# Altium PCB 1-LightingAndSolenoidValve.PcbDoc (part 2 of 3)
Units mm, origin at the board's own origin, x right, y up, seen from the top; angles counter-clockwise.
Board outline 272 x 85 mm, 2 copper layers (Top Layer, Bottom Layer); 366 components, 221 nets, 1073 pads, 653 vias.
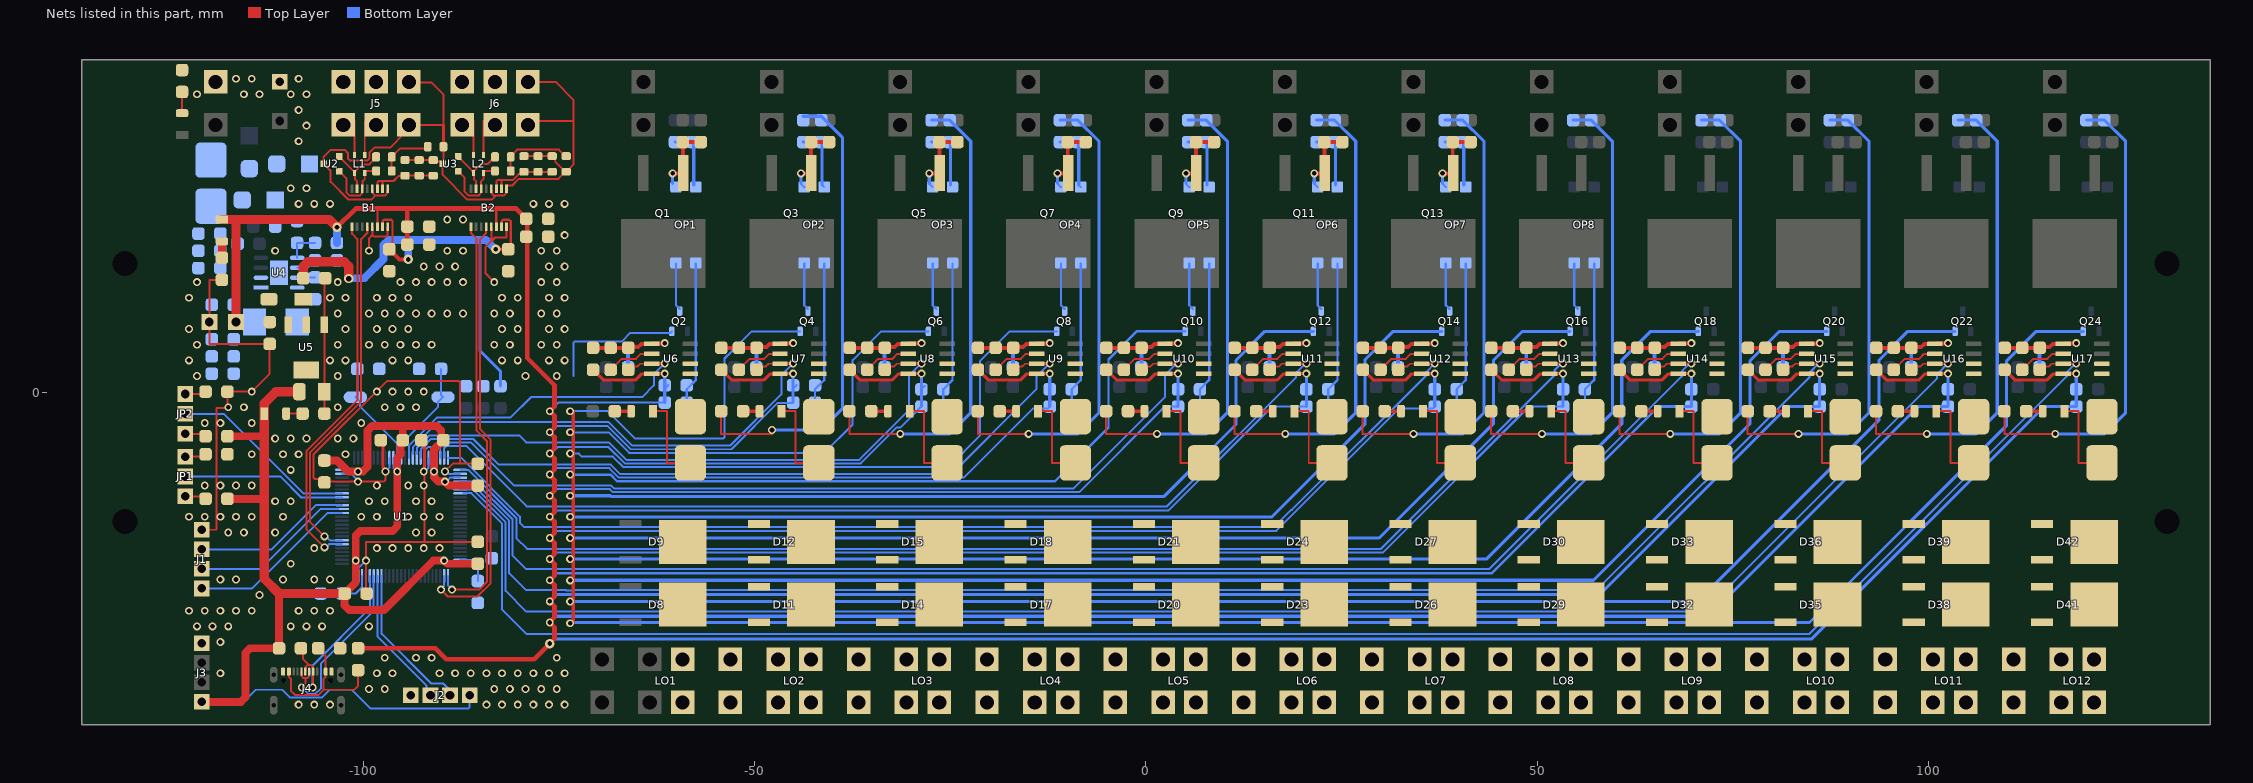
[diagram p2: the nets of this part, all layers, seen from the top]

## Via types
v1: diameter 1, hole 0.6, Top Layer to Bottom Layer, tented both sides, 648 vias
v2: diameter 1.2, hole 0.6, Top Layer to Bottom Layer, tented both sides, 4 vias
v3: diameter 1.2, hole 0.7, Top Layer to Bottom Layer, tented both sides, 1 vias

## Nets (pads, with @x,y where several pads share a name; then routed paths per layer and width w, separated by ;. In a path a pad name is that pad's centre, name@x,y a point inside that pad or via, vN(x,y) a via of type N, cw(c..) or ccw(c..) an arc to the next point about the centre after c; other vN are vias at no path point) (continued)
2GND: D11.1 D11.3 D12.1 D12.3 LO2.2 LO2.4 N2.1 N2.2 R32.2 R33.2 R36.2 | length 60.3
  Top Layer w0.254: R36.2@-54.3,-2.4 -54.3,-5.3 v1@-47.8,-5.3
  Bottom Layer w0.4: v1(-47.8,-4.8) -41.5,-4.8 -38.8,-2.1 -38.8,32.6 -41.5,35.3 R33.2@-43.8,35.3
3GND: D14.1 D14.3 D15.1 D15.3 LO3.2 LO3.4 N3.1 N3.2 R41.2 R42.2 R45.2 | length 60.3
  Top Layer w0.254: R45.2@-37.9,-2.4 -37.9,-5.3 v1(-31.4,-5.3)
  Bottom Layer w0.4: v1(-31.4,-5.3) -25.1,-5.3 -22.4,-2.6 -22.4,32.1 R41.2@-25.1,34.8 R42.2@-27.4,34.8
3v3MCU: B1.7 B2.7 C8.2 C9.2 C10.2 C11.2 C12.2 C13.2 C17.1 C24.1 C40.1 C41.1 D6.1 D7.1 J2.1 J3.1 R2.2 R4.2 R5.1 R6.2 U1.11 U1.19 U1.21 U1.22 U1.28 U1.50 U1.75 U1.100 U5.2 U5.4 | length 278.6
  Top Layer w0.3: B1.7@-97.575,21.175 -97.55,21.2 -97.55,21.899 -97.374,22.075 -96.476,22.075 -96.3,21.899 -96.3,18.7 C17.1@-96.7,18.3 ; B2.7@-82.35,21.2 -82.35,21.899 -82.174,22.075 -81.405,22.075 -81.2,21.87 -81.2,18.6 C24.1@-81.5,18.3
  Top Layer w0.4: v2(-83.1,18.3) C24.1@-81.5,18.3
  Top Layer w0.5: C17.1@-96.7,18.3 -95.4,17 v2(-94.3,17)
  Top Layer w1: J3.1@-120.7,-39.55 -115.686,-39.55 -115.1,-38.964 -115.1,-33.286 -114.514,-32.7 R5.1@-110.8,-32.7 -110.8,-25.7 ; R2.2@-117.4,-13.6 -112.7,-13.6 ; R6.2@-117.4,-5.6 -112.849,-5.6 -112.7,-5.451 ; C9.2@-105,-8.7 -103.4,-8.7 -102,-10.1 v1(-100.7,-10.1) -100.086,-10.1 -99.5,-9.514 -99.5,-4.886 -98.914,-4.3 -95,-4.3 ; C8.2@-85.4,-21.9 -89.3,-21.9 v1(-89.7,-21.5) -91.1,-21.5 -97.4,-27.8 -101.841,-27.8 -102.427,-27.214 -102.427,-25.727 C12.2@-102.4,-25.7 -101,-24.3 v1(-101,-21.5) -101,-18.286 -100.414,-17.7 -96.286,-17.7 -95.7,-17.114 v1(-95.7,-10.1) -95.7,-8.352 -95.273,-7.925 -95.273,-6.373 C13.2@-95,-6.1 -95,-4.3 ; C11.2@-85.4,-11.9 -89.1,-11.9 v1(-89.6,-11.4) -90.414,-11.4 -91,-10.814 v1(-91,-10.1) -91,-7.3 C10.2@-89.8,-6.1 -90.073,-5.827 -90.073,-4.886 -90.659,-4.3 -95,-4.3
  Top Layer w1.2: C40.1@-108.2,0.1 -111.2,0.1 -112.7,-1.4 D6.1@-112.7,-2.7 -112.7,-5.451 -112.7,-13.6 -112.7,-23.8 -110.8,-25.7 C12.2@-102.4,-25.7 ; C41.1@-107.7,14.6 -107.7,16.114 -107.114,16.7 -102.486,16.7 -101.9,16.114 v3(-101.9,14.558)
  Bottom Layer w0.254: J3.1@-120.7,-39.55 -120.65,-39.6 -115.4,-39.6 -113.8,-38 -110.4,-38 -109.419,-38.981 -105.281,-38.981 -104.3,-38 -101.5,-38 -99.1,-40.4 -86.6,-40.4 -86.45,-40.25 J2.1@-86.45,-38.7 ; U1.100@-102.75,-9.9 -101.102,-9.9 -100.902,-10.1 v1(-100.7,-10.1) ; U1.75@-101.2,-23.45 -101.2,-21.902 -101,-21.702 v1(-101,-21.5) ; U1.11@-96.2,-8.35 -96.2,-9.6 v1(-95.7,-10.1) ; U1.19@-92.2,-8.35 -92.191,-8.341 -92.191,-7.417 -91.78,-7.005 -91.395,-7.005 -91.209,-7.191 -91.209,-8.341 U1.21@-91.2,-8.35 ; v1@-91.2,-9.698 v1@-91,-9.898 ; v1(-89.7,-21.5) -89.498,-21.5 -89.098,-21.9 U1.50@-87.65,-21.9 ; v1(-89.6,-11.4) -89.431,-11.4 -88.931,-10.9 U1.28@-87.65,-10.9
  Bottom Layer w0.28: v1@-91.2,-9.698 U1.21@-91.2,-8.35 ; v1@-91,-9.907 -90.7,-9.607 U1.22@-90.7,-8.35
  Bottom Layer w0.4: -85.1,19.5 -85.1,5.3 -82.5,2.7 R4.2@-82.5,0.8
  Bottom Layer w1: v3@-101.8,14.6 -99.9,14.6 -97.45,17.05 -97.45,18.85 -96.8,19.5 -85.1,19.5 -84.354,19.5 -83.154,18.3 v2(-83.1,18.3) ; v2(-94.3,17) -94.3,19.5
4GND: D17.1 D17.3 D18.1 D18.3 LO4.2 LO4.4 N4.1 N4.2 R50.2 R51.2 R54.2 | length 60.3
  Top Layer w0.254: R54.2@-21.5,-2.4 -21.5,-5.3 v1(-15,-5.3)
  Bottom Layer w0.4: v1(-15,-5.3) -8.7,-5.3 -6,-2.6 -6,32.1 R50.2@-8.7,34.8 R51.2@-11,34.8
5GND: D20.1 D20.3 D21.1 D21.3 LO5.2 LO5.4 N5.1 N5.2 R59.2 R60.2 R63.2 | length 60.3
  Top Layer w0.254: R63.2@-5.1,-2.4 -5.1,-5.3 v1(1.4,-5.3)
  Bottom Layer w0.4: v1(1.4,-5.3) 7.7,-5.3 10.4,-2.6 10.4,32.1 R59.2@7.7,34.8 R60.2@5.4,34.8
5V: B1.6 B2.6 C15.2 C16.2 C22.2 C23.2 C34.1 C35.1 C36.1 C37.1 C38.1 C39.1 C43.1 C46.1 C49.1 C52.1 C55.1 C58.1 C61.1 C64.1 C67.1 C70.1 C73.1 C76.1 D3.1 D7.2 FUSE_SMD1.1 L3.2 R15.2 R21.2 R22.2 R30.2 R31.2 R39.2 R40.2 R48.2 R49.2 R57.2 R58.2 R66.2 R67.2 R75.2 R76.2 R84.2 R85.2 R93.2 R94.2 R102.2 R103.2 R111.2 R112.2 R120.2 R121.2 U5.3 U6.8 U7.8 U8.8 U9.8 U10.8 U11.8 U12.8 U13.8 U14.8 U15.8 U16.8 U17.8 | length 1665.5
  Top Layer w0.3: B1.6@-98.225,21.175 -98.225,23.475 -98.2,23.5 ; B2.6@-83.025,21.175 -83.025,23.475 -83,23.5
  Top Layer w0.4: C43.1@-70.673,2.9 -69.373,1.6 -65.2,1.6 -64.434,2.366 U6.8@-63.202,2.366 ; U6.8@-63.171,2.398 v1@-61.503,2.398 ; C46.1@-54.273,2.9 -52.973,1.6 -48.8,1.6 -48.034,2.366 U7.8@-46.802,2.366 ; U7.8@-46.771,2.398 v1@-45.103,2.398 ; C49.1@-37.873,2.9 -36.573,1.6 -32.4,1.6 -31.634,2.366 U8.8@-30.402,2.366 ; U8.8@-30.371,2.398 v1@-28.703,2.398 ; C52.1@-21.473,2.9 -20.173,1.6 -16,1.6 -15.234,2.366 U9.8@-14.002,2.366 ; U9.8@-13.971,2.398 v1@-12.303,2.398 ; C55.1@-5.073,2.9 -3.773,1.6 0.4,1.6 1.166,2.366 U10.8@2.398,2.366 ; U10.8@2.429,2.398 v1@4.097,2.398 ; C58.1@11.327,2.9 12.627,1.6 16.8,1.6 17.566,2.366 U11.8@18.798,2.366 ; U11.8@18.829,2.398 v1@20.497,2.398 ; C61.1@27.727,2.9 29.027,1.6 33.2,1.6 33.966,2.366 U12.8@35.198,2.366 ; U12.8@35.229,2.398 v1@36.897,2.398 ; C64.1@44.127,2.9 45.427,1.6 49.6,1.6 50.366,2.366 U13.8@51.598,2.366 ; U13.8@51.629,2.398 v1@53.297,2.398 ; C67.1@60.527,2.9 61.827,1.6 66,1.6 66.766,2.366 U14.8@67.998,2.366 ; U14.8@68.029,2.398 v1@69.697,2.398 ; C70.1@76.927,2.9 78.227,1.6 82.4,1.6 83.166,2.366 U15.8@84.398,2.366 ; U15.8@84.429,2.398 v1@86.097,2.398 ; C73.1@93.327,2.9 94.627,1.6 98.8,1.6 99.566,2.366 U16.8@100.798,2.366 ; U16.8@100.829,2.398 v1@102.497,2.398 ; C76.1@109.727,2.9 111.027,1.6 115.2,1.6 115.966,2.366 117.198,2.366 U17.8@117.227,2.395 117.229,2.398 118.898,2.398 v1(118.9,2.4)
  Top Layer w0.6: v2(-103.4,21.1) -101,23.5 -98.2,23.5 -94.6,23.5 ; FUSE_SMD1.1@-100.7,-32.7 -90.813,-32.7 -89.413,-34.1 -78.2,-34.1 v2(-76.2,-32.1) -76.2,-32.049 -75.6,-31.449 -75.6,-30 v1(-76.2,-29.4) -76.2,-29.349 -75.6,-28.749 -75.6,-27.351 -76.2,-26.751 v1(-76.2,-26.7) -75.6,-26.1 -75.6,-24.6 v1(-76.2,-24) -75.6,-23.4 -75.6,-21.9 v1(-76.2,-21.3) -75.6,-20.7 -75.6,-19.2 v1(-76.2,-18.6) -75.6,-18 -75.6,-16.5 v1(-76.2,-15.9) -75.6,-15.3 -75.6,-13.8 v1(-76.2,-13.2) ; C16.2@-94.4,18.9 C15.2@-94.4,21.2 -94.4,23.3 -94.6,23.5 ; v1@-76.2,-13.149 -75.6,-12.549 -75.6,-11.151 -76.2,-10.551 v1(-76.2,-10.5) -75.6,-9.9 -75.6,-8.4 v1(-76.2,-7.8) -75.6,-7.2 -75.6,-5.7 v1(-76.2,-5.1) -75.6,-4.5 -75.6,-3 v1(-76.2,-2.4) -75.6,-1.8 -75.6,0.9 -79.1,4.4 -79.1,22.1 C22.2@-79.2,22.2 -80.5,23.5 -83,23.5 -94.6,23.5
  Top Layer w1.2: D3.1@-118.1,22.1 -116.3,22.1 ; C38.1@-116.3,9 -116.3,22.1 ; v2(-103.4,21.1) -104.4,22.1 -116.3,22.1
  Bottom Layer w0.254: v1(-76.2,-21.3) -75.373,-20.473 30.28,-20.473 48.953,-1.8 R85.2@53.3,-1.8 ; v1(-76.2,-18.6) -75.284,-17.684 16.67,-17.684 32.28,-2.073 36.627,-2.073 R76.2@36.9,-1.8 ; v1(-76.2,-15.9) -75.373,-15.073 2.88,-15.073 16.153,-1.8 R67.2@20.5,-1.8 ; v1(-76.2,-13.2) -75.373,-12.373 -68.523,-12.373 -68.14,-12.756 -8.556,-12.756 2.4,-1.8 R58.2@4.1,-1.8 ; v1(-76.2,-10.5) -75.373,-9.673 -68.59,-9.673 -67.369,-10.894 -23.294,-10.894 -14.473,-2.073 -12.573,-2.073 R49.2@-12.3,-1.8 ; v1(-76.2,-7.8) -76.043,-7.8 -75.216,-6.973 -68.721,-6.973 -66.616,-9.078 -52.226,-9.078 -40.554,-9.078 -36.436,-9.078 -31.831,-4.473 -31.373,-4.473 R40.2@-28.7,-1.8 ; v1(-76.2,-5.1) -75.373,-4.273 -68.853,-4.273 -65.864,-7.262 -53.455,-7.262 -52.978,-7.262 -47.048,-1.332 -45.132,-1.332 R31.2@-45.1,-1.3 ; v1(-76.2,-2.4) -75.1,-1.3 R21.2@-61.5,-1.3 ; R22.2@-61.5,0.5 R22.2@-61.065,0.935 ; R30.2@-45.1,0.5 R30.2@-44.665,0.935 ; R39.2@-28.7,0.4 R39.2@-28.265,0.835
  Bottom Layer w0.35: v1(-76.2,-24) -75.3,-23.1 44.2,-23.1 65.5,-1.8 R94.2@69.7,-1.8
  Bottom Layer w0.4: v2(-76.2,-32.1) -75.6,-31.5 85.1,-31.5 114.8,-1.8 R121.2@118.9,-1.8 R120.2@118.9,0.4 v1(118.9,2.4) ; v1(-76.2,-29.4) -75.4,-28.6 71.9,-28.6 98.7,-1.8 R112.2@102.5,-1.8 v1(102.5,2.4) ; v1(-76.2,-26.7) -75.319,-25.819 -74.359,-25.819 -74.349,-25.829 -72.851,-25.829 -72.841,-25.819 57.981,-25.819 82,-1.8 R103.2@86.1,-1.8 v1(86.1,2.4) ; R21.2@-61.5,-1.3 -61.5,0.5 v1(-61.5,2.4) ; R31.2@-45.1,-1.3 -45.1,0.5 v1(-45.1,2.4) ; R40.2@-28.7,-1.8 R39.2@-28.7,0.4 v1(-28.7,2.4) ; R49.2@-12.3,-1.8 v1(-12.3,2.4) ; R58.2@4.1,-1.8 v1(4.1,2.4) ; R67.2@20.5,-1.8 v1(20.5,2.4) ; R76.2@36.9,-1.8 v1(36.9,2.4) ; R85.2@53.3,-1.8 v1(53.3,2.4) ; R94.2@69.7,-1.8 v1(69.7,2.4)
  Bottom Layer w1: R15.2@-103.4,19.1 v2(-103.4,21.1)
6GND: D23.1 D23.3 D24.1 D24.3 LO6.2 LO6.4 N6.1 N6.2 R68.2 R69.2 R72.2 | length 60.3
  Top Layer w0.254: R72.2@11.3,-2.4 11.3,-5.3 v1(17.8,-5.3)
  Bottom Layer w0.4: v1(17.8,-5.3) 24.1,-5.3 26.8,-2.6 26.8,32.1 R68.2@24.1,34.8 R69.2@21.8,34.8
7GND: D26.1 D26.3 D27.1 D27.3 LO7.2 LO7.4 N7.1 N7.2 R77.2 R78.2 R81.2 | length 60.3
  Top Layer w0.254: R81.2@27.7,-2.4 27.7,-5.3 v1(34.2,-5.3)
  Bottom Layer w0.4: v1(34.2,-5.3) 40.5,-5.3 43.2,-2.6 43.2,32.1 R77.2@40.5,34.8 R78.2@38.2,34.8
8GND: D29.1 D29.3 D30.1 D30.3 LO8.2 LO8.4 N8.1 N8.2 R86.2 R87.2 R90.2 | length 60.3
  Top Layer w0.254: R90.2@44.1,-2.4 44.1,-5.3 v1(50.6,-5.3)
  Bottom Layer w0.4: v1(50.6,-5.3) 56.9,-5.3 59.6,-2.6 59.6,32.1 R86.2@56.9,34.8 R87.2@54.6,34.8
9GND: D32.1 D32.3 D33.1 D33.3 LO9.2 LO9.4 N9.1 N9.2 R95.2 R96.2 R99.2 | length 60.3
  Top Layer w0.254: R99.2@60.5,-2.4 60.5,-5.3 v1(67,-5.3)
  Bottom Layer w0.4: v1(67,-5.3) 73.3,-5.3 76,-2.6 76,32.1 R95.2@73.3,34.8 R96.2@71,34.8
10GND: D35.1 D35.3 D36.1 D36.3 LO10.2 LO10.4 N10.1 N10.2 R104.2 R105.2 R108.2 | length 60.3
  Top Layer w0.254: R108.2@76.9,-2.4 76.9,-5.3 v1(83.4,-5.3)
  Bottom Layer w0.4: v1(83.4,-5.3) 89.7,-5.3 92.4,-2.6 92.4,32.1 R104.2@89.7,34.8 R105.2@87.4,34.8
11GND: D38.1 D38.3 D39.1 D39.3 LO11.2 LO11.4 N11.1 N11.2 R113.2 R114.2 R117.2 | length 60.3
  Top Layer w0.254: R117.2@93.3,-2.4 93.3,-5.3 v1(99.8,-5.3)
  Bottom Layer w0.4: v1(99.8,-5.3) 106.1,-5.3 108.8,-2.6 108.8,32.1 R113.2@106.1,34.8 R114.2@103.8,34.8
12GND: D41.1 D41.3 D42.1 D42.3 LO12.2 LO12.4 N12.1 N12.2 R122.2 R123.2 R126.2 | length 60.3
  Top Layer w0.254: R126.2@109.7,-2.4 109.7,-5.3 v1(116.2,-5.3)
  Bottom Layer w0.4: v1(116.2,-5.3) 122.5,-5.3 125.2,-2.6 125.2,32.1 R122.2@122.5,34.8 R123.2@120.2,34.8
Boot0: JP2.2 U1.94 | length 24.3
  Bottom Layer w0.254: JP2.2@-122.8,-2.74 -117.86,-2.74 -107.7,-12.9 U1.94@-102.75,-12.9
DCin: C31.1 C32.1 C33.1 D5.2 FH1.2 R16.1 U4.2
feedback: R15.1 R17.2 U4.5 | length 4.2
  Bottom Layer w0.254: U4.5@-108.484,17.205 -108.5,17.221 R17.2@-108.5,19.1 R15.1@-106.2,19.1
MCUGND: B1.5 B1.8 B2.5 B2.8 C1.1 C2.1 C3.1 C4.1 C5.1 C6.1 C7.1 C8.1 C9.1 C10.1 C11.1 C12.1 C13.1 C15.1 C16.1 C17.2 C22.1 C23.1 C24.2 C28.2 C29.2 C31.2 C32.2 C33.2 C34.2 C35.2 C36.2 C37.2 C38.2 C39.2 C40.2 C41.2 C42.2 C43.2 C44.2 C45.2 C46.2 C47.2 C48.2 C49.2 C50.2 C51.2 C52.2 C53.2 C54.2 C55.2 C56.2 C57.2 C58.2 C59.2 C60.2 C61.2 C62.2 C63.2 C64.2 C65.2 C66.2 C67.2 C68.2 C69.2 C70.2 C71.2 C72.2 C73.2 C74.2 C75.2 C76.2 C77.2 D4.1 D5.1 J1.4 J2.4 J3.4 J4.A1B12 J4.B1A12 POWER1.1 Q2.2 Q4.2 Q6.2 Q8.2 Q10.2 Q12.2 Q14.2 Q16.2 Q18.2 Q20.2 Q22.2 Q24.2 R1.2 R3.2 R7.2 R12.1 R13.1 R14.1 R17.1 R18.2 R26.2 R35.2 R44.2 R53.2 R62.2 R71.2 R80.2 R89.2 R98.2 R107.2 R116.2 R125.2 U1.10 U1.20 U1.27 U1.74 U1.99 U4.1 U4.9 U5.1 U6.5 U7.5 U8.5 U9.5 U10.5 U11.5 U12.5 U13.5 U14.5 U15.5 U16.5 U17.5 | length 1755.1
  Top Layer w0.254: J1.4@-120.7,-17.55 -118.8,-17.55 -118.8,-2 -117.4,-2 R7.2@-117.4,0.1 -114.3,0.1 -112,2.4 C39.2@-112,6.2 -119.7,6.2 C38.2@-119.7,9 -119.7,14.4 R13.1@-118.1,14.4 ; R14.1@-105,-2.7 C40.2@-105,0.1 ; C40.2@-105,0.1 U5.1@-104.999,8.649 -104.999,14.6 C41.2@-104.9,14.6 ; v1@-100.75,-11.35 v1(-100.7,-11.4) ; C12.1@-99.6,-25.7 -99.7,-25.6 v1(-99.7,-21.5) -99.7,-19.1 -92.2,-19.1 ; v1(-99.3,18.1) -99.3,19.699 -98.875,20.124 ; B1.5@-98.875,21.175 -98.875,20.124 ; C13.1@-97.8,-6.1 C13.1@-97.527,-6.373 ; v1@-97.2,-9.905 -97.2,-11.151 -97.449,-11.4 v1(-100.7,-11.4) ; B1.8@-96.925,21.175 -96.925,20.049 -97.074,19.9 -98.651,19.9 -98.875,20.124 ; C10.1@-92.6,-6.1 C10.1@-92.2,-6.5 ; v1(-92.3,-10.1) -92.2,-10.2 -92.2,-19.1 ; v1(-89.6,-10.1) -88.6,-9.1 -87.7,-9.1 ; C8.1@-85.4,-19.1 -92.2,-19.1 ; C11.1@-85.4,-9.1 -87.7,-9.1 ; -83.8,19.6 -83.675,19.725 B2.5@-83.675,21.175 ; v1(-83.3,14.1) -84.4,15.2 -84.4,18.6 -83.2,19.8 -81.725,19.8 B2.8@-81.725,21.175 ; v1(-100.7,-11.4) -104.9,-11.4 C9.1@-105,-11.5 -105.418,-11.082 -106.251,-11.082 -106.4,-10.933 -106.4,-7.922 -97,1.478 -87.849,1.478 -87.7,1.33 -87.7,-9.1
  Top Layer w0.4: C13.1@-97.527,-6.373 -97.527,-9.578 v1@-97.2,-9.905 ; v1@-92.2,-10.1 C10.1@-92.2,-6.5 ; v1@-73.2,-29.4 v1@-73.2,-2.4
  Top Layer w0.5: C43.2@-70.673,5.7 C44.2@-66.173,5.7 ; C44.2@-66.089,5.784 -64.916,5.784 -64.495,6.205 U6.5@-63.173,6.205 ; U6.5@-63.126,6.252 v1@-61.548,6.252 ; C46.2@-54.273,5.7 C47.2@-49.773,5.7 ; C47.2@-49.689,5.784 -48.516,5.784 -48.095,6.205 U7.5@-46.773,6.205 ; U7.5@-46.726,6.252 v1@-45.148,6.252 ; C49.2@-37.873,5.7 C50.2@-33.373,5.7 ; C50.2@-33.289,5.784 -32.116,5.784 -31.695,6.205 U8.5@-30.373,6.205 ; U8.5@-30.326,6.252 v1@-28.748,6.252 ; C52.2@-21.473,5.7 C53.2@-16.973,5.7 ; C53.2@-16.889,5.784 -15.716,5.784 -15.295,6.205 U9.5@-13.973,6.205 ; U9.5@-13.926,6.252 v1@-12.348,6.252 ; C55.2@-5.073,5.7 C56.2@-0.573,5.7 ; C56.2@-0.489,5.784 0.684,5.784 1.105,6.205 U10.5@2.427,6.205 ; U10.5@2.474,6.252 v1@4.052,6.252 ; C58.2@11.327,5.7 C59.2@15.827,5.7 ; C59.2@15.911,5.784 17.084,5.784 17.505,6.205 U11.5@18.827,6.205 ; U11.5@18.874,6.252 v1@20.452,6.252 ; C61.2@27.727,5.7 C62.2@32.227,5.7 ; C62.2@32.311,5.784 33.484,5.784 33.905,6.205 U12.5@35.227,6.205 ; U12.5@35.274,6.252 v1@36.852,6.252 ; C64.2@44.127,5.7 C65.2@48.627,5.7 ; C65.2@48.711,5.784 49.884,5.784 50.305,6.205 U13.5@51.627,6.205 ; U13.5@51.674,6.252 v1@53.252,6.252 ; C67.2@60.527,5.7 C68.2@65.027,5.7 ; C68.2@65.111,5.784 66.284,5.784 66.705,6.205 U14.5@68.027,6.205 ; U14.5@68.074,6.252 v1@69.652,6.252 ; C70.2@76.927,5.7 C71.2@81.427,5.7 ; C71.2@81.511,5.784 82.684,5.784 83.105,6.205 U15.5@84.427,6.205 ; U15.5@84.474,6.252 v1@86.052,6.252 ; C73.2@93.327,5.7 C74.2@97.827,5.7 ; C74.2@97.911,5.784 99.084,5.784 99.505,6.205 U16.5@100.827,6.205 ; U16.5@100.874,6.252 v1@102.452,6.252 ; C76.2@109.727,5.7 C75.2@111.977,5.7 C77.2@114.227,5.7 114.311,5.784 115.484,5.784 115.905,6.205 U17.5@117.227,6.205 117.274,6.252 118.853,6.252 v1(118.9,6.3)
  Bottom Layer w0.254: U1.99@-102.75,-10.4 -101.6,-10.4 -100.7,-11.3 v1(-100.7,-11.4) ; U1.74@-100.7,-23.45 -100.691,-23.441 -100.691,-22.491 v1(-99.7,-21.5) ; v1(-97.2,-10.1) -96.7,-9.6 U1.10@-96.7,-8.35 ; v1(-92.3,-10.1) -92.2,-10.1 -91.7,-9.6 U1.20@-91.7,-8.35 ; v1(-89.6,-10.1) -89.398,-10.1 -89.098,-10.4 U1.27@-87.65,-10.4 ; v1@-73.2,-7.8 -73.181,-7.819 -72.481,-7.819 -72.1,-8.2 -68.136,-8.2 -66.804,-9.532 -25.232,-9.532 -21.2,-5.5 -21.2,4.034 -17.434,7.8 Q8.2@-11.4,7.8 ; v1@-73.2,-5.1 -68.668,-5.1 -66.052,-7.716 -41.118,-7.716 -37.5,-4.098 -37.5,4.134 -33.834,7.8 Q6.2@-27.8,7.8 ; v1@-73.2,-2.4 -68.8,-2.4 -65.3,-5.9 -54.019,-5.9 -53.87,-5.751 -53.87,4.335 -53.487,4.717 -53.483,4.717 -50.4,7.8 Q4.2@-44.2,7.8 ; -73.2,2.1 -73.2,6.351 -73.051,6.5 -67,6.5 -65.9,7.6 -60.8,7.6 Q2.2@-60.6,7.8
  Bottom Layer w0.3: v1@-73.2,-10.5 -68.437,-10.5 -67.566,-11.371 -11.671,-11.371 -4.8,-4.5 -4.8,4.2 -1.2,7.8 Q10.2@5,7.8
  Bottom Layer w0.4: v1@-73.2,-29.4 84.798,-29.4 110,-4.198 110,4.034 113.766,7.8 Q24.2@119.8,7.8 ; v1@-73.2,-26.7 70.5,-26.7 93.7,-3.5 93.7,4.139 94.161,4.6 94.166,4.6 97.366,7.8 Q22.2@103.4,7.8 ; v1@-73.2,-24 57.2,-24 77.2,-4 77.2,4.034 80.966,7.8 Q20.2@87,7.8 ; v1@-73.2,-21.3 43.5,-21.3 60.8,-4 60.8,4.1 64.5,7.8 Q18.2@70.6,7.8 ; v1@-73.2,-18.6 29.8,-18.6 44.4,-4 44.4,4.08 48.12,7.8 Q16.2@54.2,7.8 ; v1@-73.2,-15.9 16.1,-15.9 28,-4 28,4.2 31.6,7.8 Q14.2@37.8,7.8 ; v1@-73.2,-13.2 -68.441,-13.2 -68.358,-13.283 2.317,-13.283 11.5,-4.1 11.5,4.1 15.2,7.8 Q12.2@21.4,7.8
  Bottom Layer w0.5: R26.2@-66.2,3.2 -66.2,5.3 ; R35.2@-49.8,3.2 -49.8,5.3 ; R44.2@-33.4,3.2 -33.4,5.3 ; R53.2@-17,3.2 -17,5.3 ; R62.2@-0.6,3.2 -0.6,5.3 ; R71.2@15.8,3.2 15.8,5.3 ; R80.2@32.2,3.2 32.2,5.3 ; R89.2@48.6,3.2 48.6,5.3 ; R98.2@65,3.2 65,5.3 ; R107.2@81.4,3.2 81.4,5.3 ; R116.2@97.8,3.2 97.8,5.3 ; R125.2@114.2,3.2 114.2,5.3
  other v1: -108.3,-39.9 -106.3,-39.9 -104.3,-39.9 -84.3,-39.9 -82.3,-39.9 -80.3,-39.9 -78.3,-39.9 -76.3,-39.9 -74.3,-39.9 -99.3,-37.9 -97.3,-37.9 -83.3,-37.9 -81.3,-37.9 -79.3,-37.9 -77.3,-37.9 -75.3,-37.9 -118.3,-35.9 -98.3,-35.9 -96.3,-35.9 -90.3,-35.9 -88.3,-35.9 -86.3,-35.9 -84.3,-35.9 -82.3,-35.9 -80.3,-35.9 -78.3,-35.9 -76.3,-35.9 -74.3,-35.9 -97.3,-33.9 -93.3,-33.9 -91.3,-33.9 -75.3,-33.9 -118.3,-31.9 -121.3,-29.9 -119.3,-29.9 -117.3,-29.9 -109.3,-29.9 -107.3,-29.9 -105.3,-29.9 -99.3,-29.9 -73.6,-29.5 -122.3,-27.9 -120.3,-27.9 -118.3,-27.9 -116.3,-27.9 -114.3,-27.9 -108.3,-27.9 -106.3,-27.9 -104.3,-27.9 -73.6,-26.729 -113.3,-25.9 -73.6,-24.021 -118.3,-23.9 -116.3,-23.9 -110.3,-23.9 -106.3,-23.9 -104.3,-23.9 -109.3,-21.9 -73.6,-21.3 -106.3,-19.9 -98.3,-19.9 -96.3,-19.9 -94.3,-19.9 -92.3,-19.9 -90.3,-19.9 -73.6,-18.6 -117.3,-17.9 -115.3,-17.9 -111.3,-17.9 -93.3,-17.9 -91.3,-17.9 -122.3,-15.9 -120.3,-15.9 -118.3,-15.9 -116.3,-15.9 -114.3,-15.9 -110.3,-15.9 -100.3,-15.9 -98.3,-15.9 -94.3,-15.9 -92.3,-15.9 -90.3,-15.9 -73.6,-15.9 -111.3,-13.9 -109.3,-13.9 -99.3,-13.9 -97.3,-13.9 -93.3,-13.9 -91.3,-13.9 -73.6,-13.2 -120.3,-11.9 -118.3,-11.9 -116.3,-11.9 -114.3,-11.9 -98.3,-11.9 -94.3,-11.9 -92.3,-11.9 -73.6,-10.5 -109.3,-9.9 -114.3,-7.9 -110.3,-7.9 -108.3,-7.9 -102.3,-7.9 -73.6,-7.8 -111.3,-5.9 -109.3,-5.9 -107.3,-5.9 -103.3,-5.9 -101.3,-5.9 -73.6,-5.1 -120.3,-3.9 -118.3,-3.9 -114.3,-3.9 -100.3,-3.9 -73.6,-2.4 -117.3,-1.9 -115.3,-1.9 -103.3,-1.9 -97.3,-1.9 -95.3,-1.9 -93.3,-1.9 -114.3,0.1 -98.3,0.1 -96.3,0.1 -94.3,0.1 -92.3,0.1 -121.3,2.1 -103.3,2.1 -79.3,2.1 -75.3,2.1 -122.3,4.1 -104.3,4.1 -102.3,4.1 -96.3,4.1 -94.3,4.1 -82.3,4.1 -80.3,4.1 -76.3,4.1 -74.3,4.1 -121.3,6.1 -103.3,6.1 -99.3,6.1 -97.3,6.1 -95.3,6.1 -93.3,6.1 -91.3,6.1 -83.3,6.1 -81.3,6.1 -77.3,6.1 -75.3,6.1 -61.5,6.3 -45.1,6.3 -28.7,6.3 -12.3,6.3 4.1,6.3 20.5,6.3 36.9,6.3 53.3,6.3 69.7,6.3 86.1,6.3 102.5,6.3 -122.3,8.1 -102.3,8.1 -98.3,8.1 -96.3,8.1 -94.3,8.1 -82.3,8.1 -80.3,8.1 -76.3,8.1 -74.3,8.1 -103.3,10.1 -99.3,10.1 -97.3,10.1 -95.3,10.1 -93.3,10.1 -91.3,10.1 -89.3,10.1 -87.3,10.1 -83.3,10.1 -81.3,10.1 -77.3,10.1 -75.3,10.1 -122.3,12.1 -104.3,12.1 -102.3,12.1 -98.3,12.1 -96.3,12.1 -94.3,12.1 -82.3,12.1 -80.3,12.1 -76.3,12.1 -74.3,12.1 -121.3,14.1 -103.3,14.1 -95.3,14.1 -93.3,14.1 -91.3,14.1 -89.3,14.1 -87.3,14.1 -77.3,14.1 -75.3,14.1 -92.3,16.1 -90.3,16.1 -88.3,16.1 -76.3,16.1 -74.3,16.1 -111.3,18.1 -89.3,18.1 -87.3,18.1 -77.3,18.1 -75.3,18.1 -74.3,20.1 -89.3,22.1 -87.3,22.1 -108.3,24.1 -106.3,24.1 -104.3,24.1 -78.3,24.1 -76.3,24.1 -74.3,24.1 -109.3,26.1 -107.3,26.1 -108.3,32.1 -107.3,34.1 -108.3,36.1 -121.3,38.1 -115.3,38.1 -113.3,38.1 -109.3,38.1 -107.3,38.1 -116.3,40.1 -114.3,40.1 -108.3,40.1
MGND: B1.9 B1.12 B2.9 B2.12 C14.2 C18.1 C19.1 C20.1 C21.2 C25.1 C26.1 C27.1 J5.3 J5.6 J6.3 J6.6 U2.3 U3.3 | length 102.8
  Top Layer w0.254: B1.12@-98.875,26.025 -98.827,25.977 -98.827,25.44 -98.535,25.148 ; B1.9@-96.925,26.025 -96.973,25.977 -96.973,25.44 -97.265,25.148 -98.535,25.148 ; C20.1@-94.7,29.7 C18.1@-92.9,29.7 C19.1@-91.1,29.7 -90.893,29.493 -90.193,29.493 U3.3@-89.9,29.2 ; J5.3@-94.2,39.691 -94.109,39.6 -91.3,39.6 -89.8,38.1 -89.8,34.166 -93.675,34.166 -94.2,34.691 -94.725,34.166 -94.725,33.175 -96.6,31.3 -98.616,31.3 -99.227,30.689 -99.227,29.911 -99.515,29.623 -101.723,29.623 -102,29.9 -102,30.6 -102.4,31 -104.2,31 -105.1,30.1 U2.3@-105.1,29.2 -104.2,28.3 -104.2,26.921 -101.925,24.646 -99.037,24.646 -98.535,25.148 ; C14.2@-89.8,31.4 -89.8,29.3 U3.3@-89.9,29.2 ; B2.12@-83.675,26.025 -83.627,25.977 -83.627,25.44 -83.335,25.148 -83.1,25.148 ; C27.1@-79.5,30.2 C25.1@-77.7,30.2 C26.1@-75.9,30.2 ; J6.6@-79,34.691 -73.173,34.691 ; J6.3@-79,39.691 -75.464,39.691 -73.173,37.4 -73.173,34.691 ; C26.1@-75.867,30.2 -75.503,29.836 -75.503,29.503 -74.2,28.2 -75.1,27.3 -80.142,27.3 -80.994,26.448 -81.677,26.448 -81.773,26.352 -81.773,25.44 -82.065,25.148 -83.1,25.148 ; C21.2@-74.1,28.2 -74.067,28.2 -73.627,28.64 -73.627,28.673 -73.173,29.127 -73.173,34.691 ; U3.3@-89.9,29.2 -89.9,27.821 -86.725,24.646 -83.602,24.646 -83.1,25.148
  Top Layer w0.4: C14.2@-89.8,31.4 -89.8,34.166
MODE: JP1.2 U1.93 | length 21.2
  Bottom Layer w0.254: JP1.2@-122.8,-10.74 -110.66,-10.74 -108,-13.4 U1.93@-102.75,-13.4
NetB1_1: B1.1 U1.81 | length 47.3
  Top Layer w0.254: v1(-105,-19.8) -107.308,-17.492 -107.308,-7.508 -100.8,-1 -100.8,19.6 -101.475,20.275 B1.1@-101.475,21.175
  Bottom Layer w0.254: v1(-105,-19.8) -104.798,-19.8 -104.398,-19.4 U1.81@-102.75,-19.4
NetB1_4: B1.4 U1.82 | length 45.8
  Top Layer w0.254: v1(-105,-18.4) -106.854,-16.546 -106.854,-7.696 -100.3,-1.142 -100.3,19.6 -99.525,20.375 B1.4@-99.525,21.175
  Bottom Layer w0.254: v1(-105,-18.4) -104.798,-18.4 -104.298,-18.9 U1.82@-102.75,-18.9
NetB1_10: B1.10 B1.11 C18.2 C19.2 C20.2 | length 9.4
  Top Layer w0.254: B1.11@-98.225,26.025 -98.225,26.851 -98.051,27.025 -97.426,27.025 ; B1.10@-97.575,26.025 -97.575,26.876 -97.426,27.025 ; C19.2@-91.1,27.7 C18.2@-92.9,27.7 C20.2@-94.7,27.7 -94.732,27.668 -95.532,27.668 -96.175,27.025 -97.426,27.025
NetB1_14: B1.14 L1.2 R9.1 U2.1 | length 9.8
  Top Layer w0.254: U2.1@-103.1,28.26 -102.2,27.36 -102.2,25.563 -101.785,25.148 -100.515,25.148 -100.223,25.44 -100.223,25.977 B1.14@-100.175,26.025 -100.145,26.055 -100.145,26.956 -99.85,27.251 L1.2@-99.85,28.05 -99.85,28.227 -99.777,28.3 R9.1@-98.4,28.3
NetB1_15: B1.15 L1.1 R8.2 U2.2 | length 8.7
  Top Layer w0.254: U2.2@-103.1,30.14 -103.1,30.11 -101.313,28.323 -101.223,28.323 -101.15,28.25 L1.1@-101.15,28.05 -101.107,28.007 -101.107,27.269 -100.825,26.986 B1.15@-100.825,26.025 ; L1.1@-101.077,28.245 -101.077,28.323 -100.999,28.323 -100.177,29.144 -99.256,29.144 -98.4,30 R8.2@-98.4,30.1
NetB2_1: B2.1 U1.51 | length 53.1
  Top Layer w0.254: v1(-88.7,-25.2) -85.242,-25.2 -84.224,-24.182 -84.224,-6.218 -85.554,-4.888 -85.554,19.654 -86.275,20.375 B2.1@-86.275,21.175
  Bottom Layer w0.254: U1.51@-89.2,-23.45 -89.2,-24.707 -88.707,-25.2 v1(-88.7,-25.2)
NetB2_4: B2.4 U1.52 | length 55.8
  Top Layer w0.254: v1(-90.1,-25.2) -90.1,-25.206 -89.206,-26.1 -85.5,-26.1 -83.77,-24.37 -83.77,-6.03 -85.1,-4.7 -85.1,19.6 -84.325,20.375 B2.4@-84.325,21.175
  Bottom Layer w0.254: v1(-90.1,-25.2) -90.1,-25.107 -89.7,-24.707 U1.52@-89.7,-23.45
NetB2_10: B2.10 B2.11 C25.2 C26.2 C27.2 | length 9.7
  Top Layer w0.254: B2.11@-83.025,26.025 -83.025,26.975 -82.875,27.125 -82.375,27.125 ; B2.10@-82.375,26.025 -82.375,27.125 ; C26.2@-75.9,28.2 C27.2@-79.5,28.2 -79.797,27.903 -80.181,27.903 -80.959,27.125 -82.375,27.125
NetB2_14: B2.14 L2.2 R11.1 U3.1 | length 9.8
  Top Layer w0.254: U3.1@-87.9,28.26 -87.096,27.456 -87.096,25.659 -86.585,25.148 -85.315,25.148 -85.023,25.44 -85.023,25.977 B2.14@-84.975,26.025 -84.975,26.986 -84.692,27.269 -84.692,28.008 L2.2@-84.65,28.05 -84.65,28.227 -84.577,28.3 R11.1@-83.2,28.3
NetB2_15: B2.15 L2.1 R10.2 U3.2 | length 8.6
  Top Layer w0.254: U3.2@-87.9,30.14 -87.9,30.11 -86.113,28.323 -86.023,28.323 L2.1@-85.95,28.25 ; B2.15@-85.625,26.025 -85.625,26.986 -85.907,27.269 -85.907,28.007 L2.1@-85.95,28.05 L2.1@-85.95,28.25 ; R10.2@-83.2,30.1 -83.2,30.067 -83.564,29.703 -83.597,29.703 -84.1,29.2 -85,29.2 L2.1@-85.95,28.25
NetC1_2: C1.2 FUSE_SMD1.2 J4.A4B9 J4.B4A9 | length 19.3
  Top Layer w0.254: J4.A4B9@-109.54,-36.081 -109.54,-36.341 -109.3,-36.581 -109.3,-38.1 -108.7,-38.7 -105.8,-38.7 -105.1,-38 ; C1.2@-105.8,-32.7 -104.84,-33.66 J4.B4A9@-104.84,-35.68 -104.863,-35.703 -104.863,-36.364 -105.1,-36.601 -105.1,-38 ; FUSE_SMD1.2@-100.7,-35.5 -100.7,-37.5 -101.2,-38 -105.1,-38
NetC2_2: C2.2 U1.13 X1.1 | length 13.7
  Bottom Layer w0.254: U1.13@-95.2,-8.35 -95.2,-6.558 -90.473,-1.831 -90.473,-1.176 -89.897,-0.6 X1.1@-89.85,-0.6 -90.1,-0.35 C2.2@-90.1,3
NetC3_2: C3.2 U1.12 X1.2 | length 13.6
  Bottom Layer w0.254: X1.2@-101.05,-0.6 -100.8,-0.35 C3.2@-100.8,3 ; X1.2@-101.003,-0.6 -100.427,-1.176 -100.427,-1.831 -95.7,-6.558 U1.12@-95.7,-8.35
NetC6_2: C6.2 U1.73 | length 4.3
  Bottom Layer w0.254: C6.2@-102.7,-25.7 -101,-25.7 -100.209,-24.909 -100.209,-23.459 U1.73@-100.2,-23.45
NetC7_2: C7.2 U1.49 | length 4.5
  Bottom Layer w0.254: U1.49@-87.65,-21.4 -87.641,-21.409 -86.191,-21.409 -85.4,-22.2 C7.2@-85.4,-24.1
NetC14_1: C14.1 R8.1 R9.2 | length 7
  Top Layer w0.254: R9.2@-96.4,28.3 R8.1@-96.4,30.1 -96.4,30.133 -96.036,30.497 -96.003,30.497 -95.3,31.2 -92,31.2 C14.1@-91.8,31.4
NetC21_1: C21.1 R10.1 R11.2 | length 9.7
  Top Layer w0.254: R11.2@-81.2,28.3 R10.1@-81.2,30.1 -81.2,30.2 -80.373,31.027 -75.027,31.027 -74.2,30.2 C21.1@-74.1,30.2
NetC29_1: C29.1 U4.6 | length 2.7
  Bottom Layer w0.254: U4.6@-108.484,15.935 -107.165,15.935 C29.1@-106.2,16.9
NetC30_1: C30.1 U4.7 | length 2.3
  Bottom Layer w0.254: U4.7@-108.484,14.665 -106.235,14.665 C30.1@-106.2,14.7
NetC30_2: C30.2 L3.1 U4.8
NetC42_1: C42.1 U6.6 | length 6.1
  Top Layer w0.254: C42.1@-68.423,2.9 -67.023,4.3 -65.2,4.3 -64.565,4.935 U6.6@-63.173,4.935
NetC44_1: C44.1 U1.15 U6.7 | length 43.8
  Top Layer w0.254: C44.1@-65.755,3.319 -64.992,3.319 -64.646,3.665 U6.7@-63.173,3.665
  Top Layer w0.4: U6.7@-63.154,3.684 v1@-61.516,3.684
  Bottom Layer w0.254: U1.15@-94.2,-8.35 -94.2,-6.842 -90.558,-3.2 -81.2,-3.2 -78.6,-0.6 -64.4,-0.6 -62.9,0.9 -62.9,2.3 v1(-61.498,3.702)
NetC45_1: C45.1 U7.6 | length 6.1
  Top Layer w0.254: C45.1@-52.023,2.9 -50.623,4.3 -48.8,4.3 -48.165,4.935 U7.6@-46.773,4.935
NetC47_1: C47.1 U1.16 U7.7 | length 62.2
  Top Layer w0.254: C47.1@-49.355,3.319 -48.592,3.319 -48.246,3.665 U7.7@-46.773,3.665
  Top Layer w0.4: U7.7@-46.754,3.684 v1@-45.116,3.684
  Bottom Layer w0.254: U1.16@-93.677,-7.9 -93.677,-6.961 -90.516,-3.8 -68.684,-3.8 -65.676,-6.808 -53.643,-6.808 -53.166,-6.808 -46.6,-0.242 -46.6,2.2 v1(-45.098,3.702)
NetC48_1: C48.1 U8.6 | length 6.1
  Top Layer w0.254: C48.1@-35.623,2.9 -34.223,4.3 -32.4,4.3 -31.765,4.935 U8.6@-30.373,4.935
NetC50_1: C50.1 U1.17 U8.7 | length 79.3
  Top Layer w0.254: C50.1@-32.955,3.319 -32.192,3.319 -31.846,3.665 U8.7@-30.373,3.665
  Top Layer w0.4: U8.7@-30.354,3.684 v1@-28.716,3.684
  Bottom Layer w0.254: U1.17@-93.177,-7.9 -93.177,-7.103 -91.574,-5.5 -80.1,-5.5 -79.219,-6.381 -68.671,-6.381 -66.428,-8.624 -36.624,-8.624 -30.3,-2.3 -30.3,2.1 v1(-28.698,3.702)
NetC51_1: C51.1 U9.6 | length 6.1
  Top Layer w0.254: C51.1@-19.223,2.9 -17.823,4.3 -16,4.3 -15.365,4.935 U9.6@-13.973,4.935
NetC53_1: C53.1 U1.18 U9.7 | length 95
  Top Layer w0.254: C53.1@-16.555,3.319 -15.792,3.319 -15.446,3.665 U9.7@-13.973,3.665
  Top Layer w0.4: U9.7@-13.954,3.684 v1@-12.316,3.684
  Bottom Layer w0.254: U1.18@-92.7,-8.35 -92.691,-8.341 -92.691,-7.259 -91.386,-5.954 -85.988,-5.954 -82.723,-9.219 -68.402,-9.219 -67.181,-10.44 -35.872,-10.44 -24.856,-10.44 -14,0.416 -14,2 v1(-12.298,3.702)
NetC54_1: C54.1 U10.6 | length 6.1
  Top Layer w0.254: C54.1@-2.823,2.9 -1.423,4.3 0.4,4.3 1.035,4.935 U10.6@2.427,4.935
NetC56_1: C56.1 U1.23 U10.7 | length 111
  Top Layer w0.254: C56.1@-0.155,3.319 0.608,3.319 0.954,3.665 U10.7@2.427,3.665
  Top Layer w0.4: U10.7@2.446,3.684 v1@4.084,3.684
  Bottom Layer w0.254: U1.23@-90.2,-8.35 -90.2,-6.958 -89.65,-6.408 -86.25,-6.408 -80.786,-11.872 -68.382,-11.872 -67.952,-12.302 -9.302,-12.302 2.4,-0.6 2.4,2.195 3.907,3.702 v1(4.102,3.702)
NetC57_1: C57.1 U11.6 | length 6.1
  Top Layer w0.254: C57.1@13.577,2.9 14.977,4.3 16.8,4.3 17.435,4.935 U11.6@18.827,4.935
NetC59_1: C59.1 U1.24 U11.7 | length 127
  Top Layer w0.254: C59.1@16.245,3.319 17.008,3.319 17.354,3.665 U11.7@18.827,3.665
  Top Layer w0.4: U11.7@18.846,3.684 v1@20.484,3.684
  Bottom Layer w0.254: U1.24@-89.7,-8.35 -89.7,-7.1 -89.462,-6.862 -86.838,-6.862 -79.146,-14.554 2.681,-14.554 19.2,1.965 19.2,2.5 20.402,3.702 v1(20.502,3.702)
NetC60_1: C60.1 U12.6 | length 6.1
  Top Layer w0.254: C60.1@29.977,2.9 31.377,4.3 33.2,4.3 33.835,4.935 U12.6@35.227,4.935
NetC62_1: C62.1 U1.25 U12.7 | length 143.5
  Top Layer w0.254: C62.1@32.646,3.319 33.408,3.319 33.754,3.665 U12.7@35.227,3.665
  Top Layer w0.4: U12.7@35.246,3.684 v1@36.884,3.684
  Bottom Layer w0.254: U1.25@-89.2,-8.35 -87.54,-8.35 -80.027,-15.863 -80.027,-16.673 -79.47,-17.23 16.329,-17.23 18.559,-15 18.635,-15 35.8,2.165 35.8,2.6 v1(36.902,3.702)
NetC63_1: C63.1 U13.6 | length 6.1
  Top Layer w0.254: C63.1@46.377,2.9 47.777,4.3 49.6,4.3 50.235,4.935 U13.6@51.627,4.935
NetC65_1: C65.1 U1.26 U13.7 | length 161.2
  Top Layer w0.254: C65.1@49.046,3.319 49.808,3.319 50.154,3.665 U13.7@51.627,3.665
  Top Layer w0.4: U13.7@51.646,3.684 v1@53.284,3.684
  Bottom Layer w0.254: U1.26@-87.641,-9.909 -86.623,-9.909 -80.481,-16.051 -80.481,-18.619 -79.1,-20 30.035,-20 52.2,2.165 52.2,2.8 53.102,3.702 v1(53.302,3.702)
NetC66_1: C66.1 U14.6 | length 6.1
  Top Layer w0.254: C66.1@62.777,2.9 64.177,4.3 66,4.3 66.635,4.935 U14.6@68.027,4.935
NetC68_1: C68.1 U1.29 U14.7 | length 180.3
  Top Layer w0.254: C68.1@65.446,3.319 66.208,3.319 66.554,3.665 U14.7@68.027,3.665
  Top Layer w0.4: U14.7@68.046,3.684 v1@69.684,3.684
  Bottom Layer w0.254: U1.29@-87.65,-11.4 -85.774,-11.4 -80.935,-16.239 -80.935,-20.865 -79.202,-22.598 43.837,-22.598 68.5,2.065 68.5,2.7 69.503,3.702 v1(69.702,3.702)
NetC69_1: C69.1 U15.6 | length 6.1
  Top Layer w0.254: C69.1@79.177,2.9 80.577,4.3 82.4,4.3 83.035,4.935 U15.6@84.427,4.935
NetC71_1: C71.1 U1.30 U15.7 | length 199.9
  Top Layer w0.254: C71.1@81.846,3.319 82.608,3.319 82.954,3.665 U15.7@84.427,3.665
  Top Layer w0.4: U15.7@84.446,3.684 v1@86.084,3.684
  Bottom Layer w0.254: U1.30@-87.65,-11.9 -85.916,-11.9 -81.389,-16.427 -81.389,-23.111 -79.219,-25.281 -74.152,-25.281 -74.131,-25.302 -73.069,-25.302 -73.04,-25.273 57.562,-25.273 84.8,1.965 84.8,2.5 86.003,3.702 v1(86.102,3.702)
NetC72_1: C72.1 U16.6 | length 6.1
  Top Layer w0.254: C72.1@95.577,2.9 96.977,4.3 98.8,4.3 99.435,4.935 U16.6@100.827,4.935
NetC74_1: C74.1 U1.31 U16.7 | length 219.5
  Top Layer w0.254: C74.1@98.246,3.319 99.008,3.319 99.354,3.665 U16.7@100.827,3.665
  Top Layer w0.4: U16.7@100.846,3.684 v1@102.484,3.684
  Bottom Layer w0.254: U1.31@-87.65,-12.4 -86.058,-12.4 -81.843,-16.615 -81.843,-25.357 -79.19,-28.01 71.29,-28.01 101.1,1.8 101.1,2.3 v1(102.502,3.702)
NetC75_1: C75.1 U17.6 | length 6.1
  Top Layer w0.254: C75.1@111.977,2.9 113.377,4.3 115.2,4.3 115.835,4.935 U17.6@117.227,4.935
NetC77_1: C77.1 U1.32 U17.7 | length 239.4
  Top Layer w0.254: C77.1@114.227,2.9 114.646,3.319 115.408,3.319 115.754,3.665 U17.7@117.227,3.665
  Top Layer w0.4: U17.7@117.227,3.665 117.246,3.684 118.884,3.684 v1(118.903,3.702)
  Bottom Layer w0.254: U1.32@-87.2,-12.877 -86.223,-12.877 -82.297,-16.803 -82.297,-27.757 -79.154,-30.9 84.735,-30.9 117.7,2.065 117.7,2.6 v1@118.7,3.6
NetD1_2: D1.2 D4.2 FH1.1
NetD2_2: D2.2 R12.2 | length 2.7
  Top Layer w0.254: D2.2@-123.2,35.7 R12.2@-123.2,38.4
NetD3_2: D3.2 R13.2 | length 2.1
  Top Layer w1: R13.2@-118.1,17.2 D3.2@-118.1,19.3
NetD6_2: D6.2 R14.2 | length 2.1
  Top Layer w0.254: D6.2@-109.9,-2.7 R14.2@-107.8,-2.7
NetD8_4: D8.4 D9.4 D10.1 FH2.1 LO1.1 LO1.3 | length 11.4
  Top Layer w0.254: D10.1@-63,-2.4 -61.2,-2.4 -61.2,-9 FH2.1@-58.223,-9
NetD10_2: D10.2 R27.1 | length 2.1
  Top Layer w0.5: R27.1@-67.9,-2.4 D10.2@-65.8,-2.4
NetD11_4: D11.4 D12.4 D13.1 FH3.1 LO2.1 LO2.3 | length 11.4
  Top Layer w0.254: D13.1@-46.6,-2.4 -44.8,-2.4 -44.8,-9 FH3.1@-41.823,-9
NetD13_2: D13.2 R36.1 | length 2.1
  Top Layer w0.5: R36.1@-51.5,-2.4 D13.2@-49.4,-2.4
NetD14_4: D14.4 D15.4 D16.1 FH4.1 LO3.1 LO3.3 | length 11.4
  Top Layer w0.254: D16.1@-30.2,-2.4 -28.4,-2.4 -28.4,-9 FH4.1@-25.423,-9
NetD16_2: D16.2 R45.1 | length 2.1
  Top Layer w0.5: R45.1@-35.1,-2.4 D16.2@-33,-2.4
NetD17_4: D17.4 D18.4 D19.1 FH5.1 LO4.1 LO4.3 | length 11.4
  Top Layer w0.254: D19.1@-13.8,-2.4 -12,-2.4 -12,-9 FH5.1@-9.023,-9
NetD19_2: D19.2 R54.1 | length 2.1
  Top Layer w0.5: R54.1@-18.7,-2.4 D19.2@-16.6,-2.4
NetD20_4: D20.4 D21.4 D22.1 FH6.1 LO5.1 LO5.3 | length 11.4
  Top Layer w0.254: D22.1@2.6,-2.4 4.4,-2.4 4.4,-9 FH6.1@7.377,-9
NetD22_2: D22.2 R63.1 | length 2.1
  Top Layer w0.5: R63.1@-2.3,-2.4 D22.2@-0.2,-2.4
NetD23_4: D23.4 D24.4 D25.1 FH7.1 LO6.1 LO6.3 | length 11.4
  Top Layer w0.254: D25.1@19,-2.4 20.8,-2.4 20.8,-9 FH7.1@23.777,-9
NetD25_2: D25.2 R72.1 | length 2.1
  Top Layer w0.5: R72.1@14.1,-2.4 D25.2@16.2,-2.4
NetD26_4: D26.4 D27.4 D28.1 FH8.1 LO7.1 LO7.3 | length 11.4
  Top Layer w0.254: D28.1@35.4,-2.4 37.2,-2.4 37.2,-9 FH8.1@40.177,-9
NetD28_2: D28.2 R81.1 | length 2.1
  Top Layer w0.5: R81.1@30.5,-2.4 D28.2@32.6,-2.4
NetD29_4: D29.4 D30.4 D31.1 FH9.1 LO8.1 LO8.3 | length 11.4
  Top Layer w0.254: D31.1@51.8,-2.4 53.6,-2.4 53.6,-9 FH9.1@56.577,-9
NetD31_2: D31.2 R90.1 | length 2.1
  Top Layer w0.5: R90.1@46.9,-2.4 D31.2@49,-2.4
NetD32_4: D32.4 D33.4 D34.1 FH10.1 LO9.1 LO9.3 | length 11.4
  Top Layer w0.254: D34.1@68.2,-2.4 70,-2.4 70,-9 FH10.1@72.977,-9
NetD34_2: D34.2 R99.1 | length 2.1
  Top Layer w0.5: R99.1@63.3,-2.4 D34.2@65.4,-2.4
NetD35_4: D35.4 D36.4 D37.1 FH11.1 LO10.1 LO10.3 | length 11.4
  Top Layer w0.254: D37.1@84.6,-2.4 86.4,-2.4 86.4,-9 FH11.1@89.377,-9
NetD37_2: D37.2 R108.1 | length 2.1
  Top Layer w0.5: R108.1@79.7,-2.4 D37.2@81.8,-2.4
NetD38_4: D38.4 D39.4 D40.1 FH12.1 LO11.1 LO11.3 | length 11.4
  Top Layer w0.254: D40.1@101,-2.4 102.8,-2.4 102.8,-9 FH12.1@105.777,-9
NetD40_2: D40.2 R117.1 | length 2.1
  Top Layer w0.5: R117.1@96.1,-2.4 D40.2@98.2,-2.4
NetD41_4: D41.4 D42.4 D43.1 FH13.1 LO12.1 LO12.3 | length 11.4
  Top Layer w0.254: D43.1@117.4,-2.4 119.2,-2.4 119.2,-9 FH13.1@122.177,-9
NetD43_2: D43.2 R126.1 | length 2.1
  Top Layer w0.5: R126.1@112.5,-2.4 D43.2@114.6,-2.4
NetFH2_2: FH2.2 U6.1 U6.2
NetFH3_2: FH3.2 U7.1 U7.2
NetFH4_2: FH4.2 U8.1 U8.2
NetFH5_2: FH5.2 U9.1 U9.2
NetFH6_2: FH6.2 U10.1 U10.2
NetFH7_2: FH7.2 U11.1 U11.2
NetFH8_2: FH8.2 U12.1 U12.2
NetFH9_2: FH9.2 U13.1 U13.2
NetFH10_2: FH10.2 U14.1 U14.2
NetFH11_2: FH11.2 U15.1 U15.2
NetFH12_2: FH12.2 U16.1 U16.2
NetFH13_2: FH13.2 U17.1 U17.2
NetJ1_1: J1.1 U1.89 | length 21.9
  Bottom Layer w0.254: J1.1@-120.7,-25.05 -114.25,-25.05 -104.6,-15.4 U1.89@-102.75,-15.4
NetJ1_2: J1.2 U1.90 | length 20.7
  Bottom Layer w0.254: J1.2@-120.7,-22.55 -113.15,-22.55 -105.523,-14.923 U1.90@-103.2,-14.923
NetJ1_3: J1.3 U1.91 | length 20.3
  Bottom Layer w0.254: J1.3@-120.7,-20.05 -111.75,-20.05 -106.1,-14.4 U1.91@-102.75,-14.4
NetJ2_2: J2.2 U1.68 | length 19.8
  Bottom Layer w0.254: U1.68@-97.7,-23.45 -97.7,-30.869 -91.369,-37.2 -89.8,-37.2 -88.95,-38.05 J2.2@-88.95,-38.7
NetJ2_3: J2.3 U1.69 | length 18
  Bottom Layer w0.254: U1.69@-98.2,-23.45 -98.2,-31.2 -91.932,-37.468 -91.932,-38.218 J2.3@-91.45,-38.7
NetJ4_A6: J4.A6 J4.B6 R5.2 U1.71 | length 24.3
  Top Layer w0.254: R5.2@-108,-32.7 -107.727,-32.973 -107.727,-34.082 -106.956,-34.853 -106.94,-34.853 ; J4.A6@-107.44,-35.68 -107.417,-35.657 -107.417,-35.088 -107.182,-34.853 -106.94,-34.853 ; v1(-106.5,-37.7) -106.463,-37.663 -106.463,-35.703 J4.B6@-106.44,-35.68 -106.463,-35.657 -106.463,-35.088 -106.698,-34.853 -106.94,-34.853
  Bottom Layer w0.254: v1(-106.5,-37.7) -106.5,-34.9 -99.2,-27.6 U1.71@-99.2,-23.45
NetJ4_A7: J4.A7 J4.B7 U1.70 | length 24
  Top Layer w0.254: J4.B7@-107.94,-35.68 -107.917,-35.703 -107.917,-36.272 -107.682,-36.507 -107.44,-36.507 ; v1(-107.9,-37.7) -107.9,-37.6 -107.4,-37.1 -107.4,-36.547 -107.44,-36.507 ; J4.A7@-106.94,-35.68 -106.963,-35.703 -106.963,-36.272 -107.198,-36.507 -107.44,-36.507
  Bottom Layer w0.254: v1(-107.9,-37.7) -107.073,-38.527 -106.157,-38.527 -105.429,-37.798 -105.429,-34.629 -98.7,-27.9 U1.70@-98.7,-23.45
NetJ5_1: J5.1 J5.4 L1.4 | length 5.8
  Top Layer w0.254: J5.4@-102.6,34.691 -101.15,34.691 L1.4@-101.15,30.35
NetJ5_2: J5.2 J5.5 L1.3 | length 5.8
  Top Layer w0.254: L1.3@-99.85,30.35 -99.85,34.691 J5.5@-98.4,34.691
NetJ6_1: J6.1 J6.4 L2.4 | length 5.8
  Top Layer w0.254: J6.4@-87.4,34.691 -85.95,34.691 L2.4@-85.95,30.35
NetJ6_2: J6.2 J6.5 L2.3 | length 5.8
  Top Layer w0.254: L2.3@-84.65,30.35 -84.65,34.691 J6.5@-83.2,34.691
NetJP1_1: JP1.1 R2.1 | length 2.7
  Top Layer w0.254: JP1.1@-122.8,-13.28 -122.777,-13.303 -120.497,-13.303 R2.1@-120.2,-13.6
NetJP1_3: JP1.3 R3.1 | length 2.7
  Top Layer w0.254: JP1.3@-122.8,-8.2 -122.787,-8.186 -120.487,-8.186 R3.1@-120.2,-7.9
NetJP2_1: JP2.1 R6.1 | length 2.7
  Top Layer w0.254: JP2.1@-122.8,-5.28 -122.777,-5.303 -120.497,-5.303 R6.1@-120.2,-5.6
NetJP2_3: JP2.3 R7.1 | length 2.7
  Top Layer w0.254: JP2.3@-122.8,-0.2 -122.787,-0.186 -120.487,-0.186 R7.1@-120.2,0.1
NetOP1_1: OP1.1 R21.1 R22.1 | length 18.7
  Bottom Layer w0.3: R21.1@-58.7,-1.8 -58.7,0.4 -57.53,1.57 OP1.1@-57.53,16.45
NetOP1_2: OP1.2 Q2.3 | length 6
  Bottom Layer w0.3: OP1.2@-60.07,16.45 -60.07,11.146 Q2.3@-59.6,10.676
NetOP1_3: OP1.3 Q1.1 R19.2 R20.2 | length 9
  Top Layer w0.254: Q1.1@-59.204,28 Q1.1@-59.158,28.046 Q1.1@-59.2,28.088
  Top Layer w0.5: v1(-60.5,28) Q1.1@-59.204,28 ; Q1.1@-59.2,28.088 R20.2@-59.2,32 R19.2@-56.9,32
  Bottom Layer w0.4: OP1.3@-60.5,26.68 v1(-60.5,28)
NetOP1_4: OP1.4 R23.1 R24.1 | length 7.7
  Bottom Layer w0.4: R23.1@-60.2,32 R24.1@-57.9,32 ; OP1.4@-57.794,26.514 R24.1@-57.794,31.894
NetOP2_1: OP2.1 R30.1 R31.1 | length 18.7
  Bottom Layer w0.3: R31.1@-42.3,-1.8 -42.3,0.4 -41.13,1.57 OP2.1@-41.13,16.45
NetOP2_2: OP2.2 Q4.3 | length 6
  Bottom Layer w0.3: OP2.2@-43.67,16.45 -43.67,11.146 Q4.3@-43.2,10.676
NetOP2_3: OP2.3 Q3.1 R28.2 R29.2 | length 9.6
  Top Layer w0.254: Q3.1@-42.804,28 Q3.1@-42.758,28.046 ; Q3.1@-42.8,28.088 Q3.1@-42.758,28.046
  Top Layer w0.5: v1(-44.1,28) Q3.1@-42.804,28 ; Q3.1@-42.8,28.088 R29.2@-42.8,32 R28.2@-40.5,32
  Bottom Layer w0.254: OP2.3@-44.1,26.68 OP2.3@-43.67,26.25
  Bottom Layer w0.4: OP2.3@-44.1,26.68 v1(-44.1,28)
NetOP2_4: OP2.4 R32.1 R33.1 | length 8.2
  Bottom Layer w0.254: R32.1@-41.5,32 R32.1@-41.394,31.894 ; OP2.4@-41.394,26.514 OP2.4@-41.13,26.25
  Bottom Layer w0.4: R33.1@-43.8,32 R32.1@-41.5,32 ; OP2.4@-41.394,26.514 R32.1@-41.394,31.894
NetOP3_1: OP3.1 R39.1 R40.1 | length 18.7
  Bottom Layer w0.3: R40.1@-25.9,-1.8 R39.1@-25.9,0.4 -24.73,1.57 OP3.1@-24.73,16.45
NetOP3_2: OP3.2 Q6.3 | length 6
  Bottom Layer w0.3: OP3.2@-27.27,16.45 -27.27,11.146 Q6.3@-26.8,10.676
NetOP3_3: OP3.3 Q5.1 R37.2 R38.2 | length 9.6
  Top Layer w0.254: Q5.1@-26.404,28 Q5.1@-26.358,28.046 Q5.1@-26.4,28.088
  Top Layer w0.5: v1(-27.7,28) Q5.1@-26.404,28 ; Q5.1@-26.4,28.088 R38.2@-26.4,32 R37.2@-24.1,32
  Bottom Layer w0.254: OP3.3@-27.7,26.68 OP3.3@-27.27,26.25
  Bottom Layer w0.4: OP3.3@-27.7,26.68 v1(-27.7,28)
NetOP3_4: OP3.4 R41.1 R42.1 | length 7.7
  Bottom Layer w0.4: R42.1@-27.4,32 R41.1@-25.1,32 ; OP3.4@-24.994,26.514 R41.1@-24.994,31.894
NetOP4_1: OP4.1 R48.1 R49.1 | length 18.7
  Bottom Layer w0.3: R49.1@-9.5,-1.8 R48.1@-9.5,0.4 -8.33,1.57 OP4.1@-8.33,16.45
NetOP4_2: OP4.2 Q8.3 | length 6
  Bottom Layer w0.3: OP4.2@-10.87,16.45 -10.87,11.146 Q8.3@-10.4,10.676
NetOP4_3: OP4.3 Q7.1 R46.2 R47.2 | length 9.6
  Top Layer w0.254: Q7.1@-10.004,28 Q7.1@-9.958,28.046 Q7.1@-10,28.088
  Top Layer w0.5: v1(-11.3,28) Q7.1@-10.004,28 ; Q7.1@-10,28.088 R46.2@-10,32 R47.2@-7.7,32
  Bottom Layer w0.254: OP4.3@-11.3,26.68 OP4.3@-10.87,26.25
  Bottom Layer w0.4: OP4.3@-11.3,26.68 v1(-11.3,28)
NetOP4_4: OP4.4 R50.1 R51.1 | length 8.2
  Bottom Layer w0.254: R50.1@-8.7,32 R50.1@-8.594,31.894 ; OP4.4@-8.594,26.514 OP4.4@-8.33,26.25
  Bottom Layer w0.4: R51.1@-11,32 R50.1@-8.7,32 ; OP4.4@-8.594,26.514 R50.1@-8.594,31.894
NetOP5_1: OP5.1 R57.1 R58.1 | length 18.7
  Bottom Layer w0.3: R58.1@6.9,-1.8 R57.1@6.9,0.4 8.07,1.57 OP5.1@8.07,16.45
NetOP5_2: OP5.2 Q10.3 | length 6
  Bottom Layer w0.3: OP5.2@5.53,16.45 5.53,11.146 Q10.3@6,10.676
NetOP5_3: OP5.3 Q9.1 R55.2 R56.2 | length 9.6
  Top Layer w0.254: Q9.1@6.396,28 Q9.1@6.442,28.046 Q9.1@6.4,28.088
  Top Layer w0.5: v1(5.1,28) Q9.1@6.396,28 ; Q9.1@6.4,28.088 R55.2@6.4,32 R56.2@8.7,32
  Bottom Layer w0.254: OP5.3@5.1,26.68 OP5.3@5.53,26.25
  Bottom Layer w0.4: OP5.3@5.1,26.68 v1(5.1,28)
NetOP5_4: OP5.4 R59.1 R60.1 | length 7.7
  Bottom Layer w0.4: R60.1@5.4,32 R59.1@7.7,32 ; OP5.4@7.806,26.514 R59.1@7.806,31.894
NetOP6_1: OP6.1 R66.1 R67.1 | length 18.7
  Bottom Layer w0.3: R67.1@23.3,-1.8 R66.1@23.3,0.4 24.47,1.57 OP6.1@24.47,16.45
NetOP6_2: OP6.2 Q12.3 | length 6
  Bottom Layer w0.3: OP6.2@21.93,16.45 21.93,11.146 Q12.3@22.4,10.676
NetOP6_3: OP6.3 Q11.1 R64.2 R65.2 | length 9.6
  Top Layer w0.254: Q11.1@22.796,28 Q11.1@22.842,28.046 Q11.1@22.8,28.088
  Top Layer w0.5: v1(21.5,28) Q11.1@22.796,28 ; Q11.1@22.8,28.088 R64.2@22.8,32 R65.2@25.1,32
  Bottom Layer w0.254: OP6.3@21.5,26.68 OP6.3@21.93,26.25
  Bottom Layer w0.4: OP6.3@21.5,26.68 v1(21.5,28)
NetOP6_4: OP6.4 R68.1 R69.1 | length 7.7
  Bottom Layer w0.4: R69.1@21.8,32 R68.1@24.1,32 ; OP6.4@24.206,26.514 R68.1@24.206,31.894
NetOP7_1: OP7.1 R75.1 R76.1 | length 18.7
  Bottom Layer w0.3: R76.1@39.7,-1.8 R75.1@39.7,0.4 40.87,1.57 OP7.1@40.87,16.45
NetOP7_2: OP7.2 Q14.3 | length 6
  Bottom Layer w0.3: OP7.2@38.33,16.45 38.33,11.146 Q14.3@38.8,10.676
NetOP7_3: OP7.3 Q13.1 R73.2 R74.2 | length 9.6
  Top Layer w0.254: Q13.1@39.196,28 Q13.1@39.242,28.046 Q13.1@39.2,28.088
  Top Layer w0.5: v1(37.9,28) Q13.1@39.196,28 ; Q13.1@39.2,28.088 R73.2@39.2,32 R74.2@41.5,32
  Bottom Layer w0.254: OP7.3@37.9,26.68 OP7.3@38.33,26.25
  Bottom Layer w0.4: OP7.3@37.9,26.68 v1(37.9,28)
NetOP7_4: OP7.4 R77.1 R78.1 | length 7.7
  Bottom Layer w0.4: R78.1@38.2,32 R77.1@40.5,32 ; OP7.4@40.606,26.514 R77.1@40.606,31.894
NetOP8_1: OP8.1 R84.1 R85.1 | length 18.7
  Bottom Layer w0.3: R85.1@56.1,-1.8 R84.1@56.1,0.4 57.27,1.57 OP8.1@57.27,16.45
NetOP8_2: OP8.2 Q16.3 | length 6
  Bottom Layer w0.3: OP8.2@54.73,16.45 54.73,11.146 Q16.3@55.2,10.676